# Altium PCB latest_Audio_Meter_V4.5.PcbDoc (part 2 of 4)
Units mil, origin at the board's own origin, x right, y up, seen from the top; angles counter-clockwise.
Board outline 2756.14 x 2519.69 mil, 2 copper layers (Top Layer, Bottom Layer), stack 57.087 mil thick; 115 components, 61 nets, 352 pads, 840 vias.
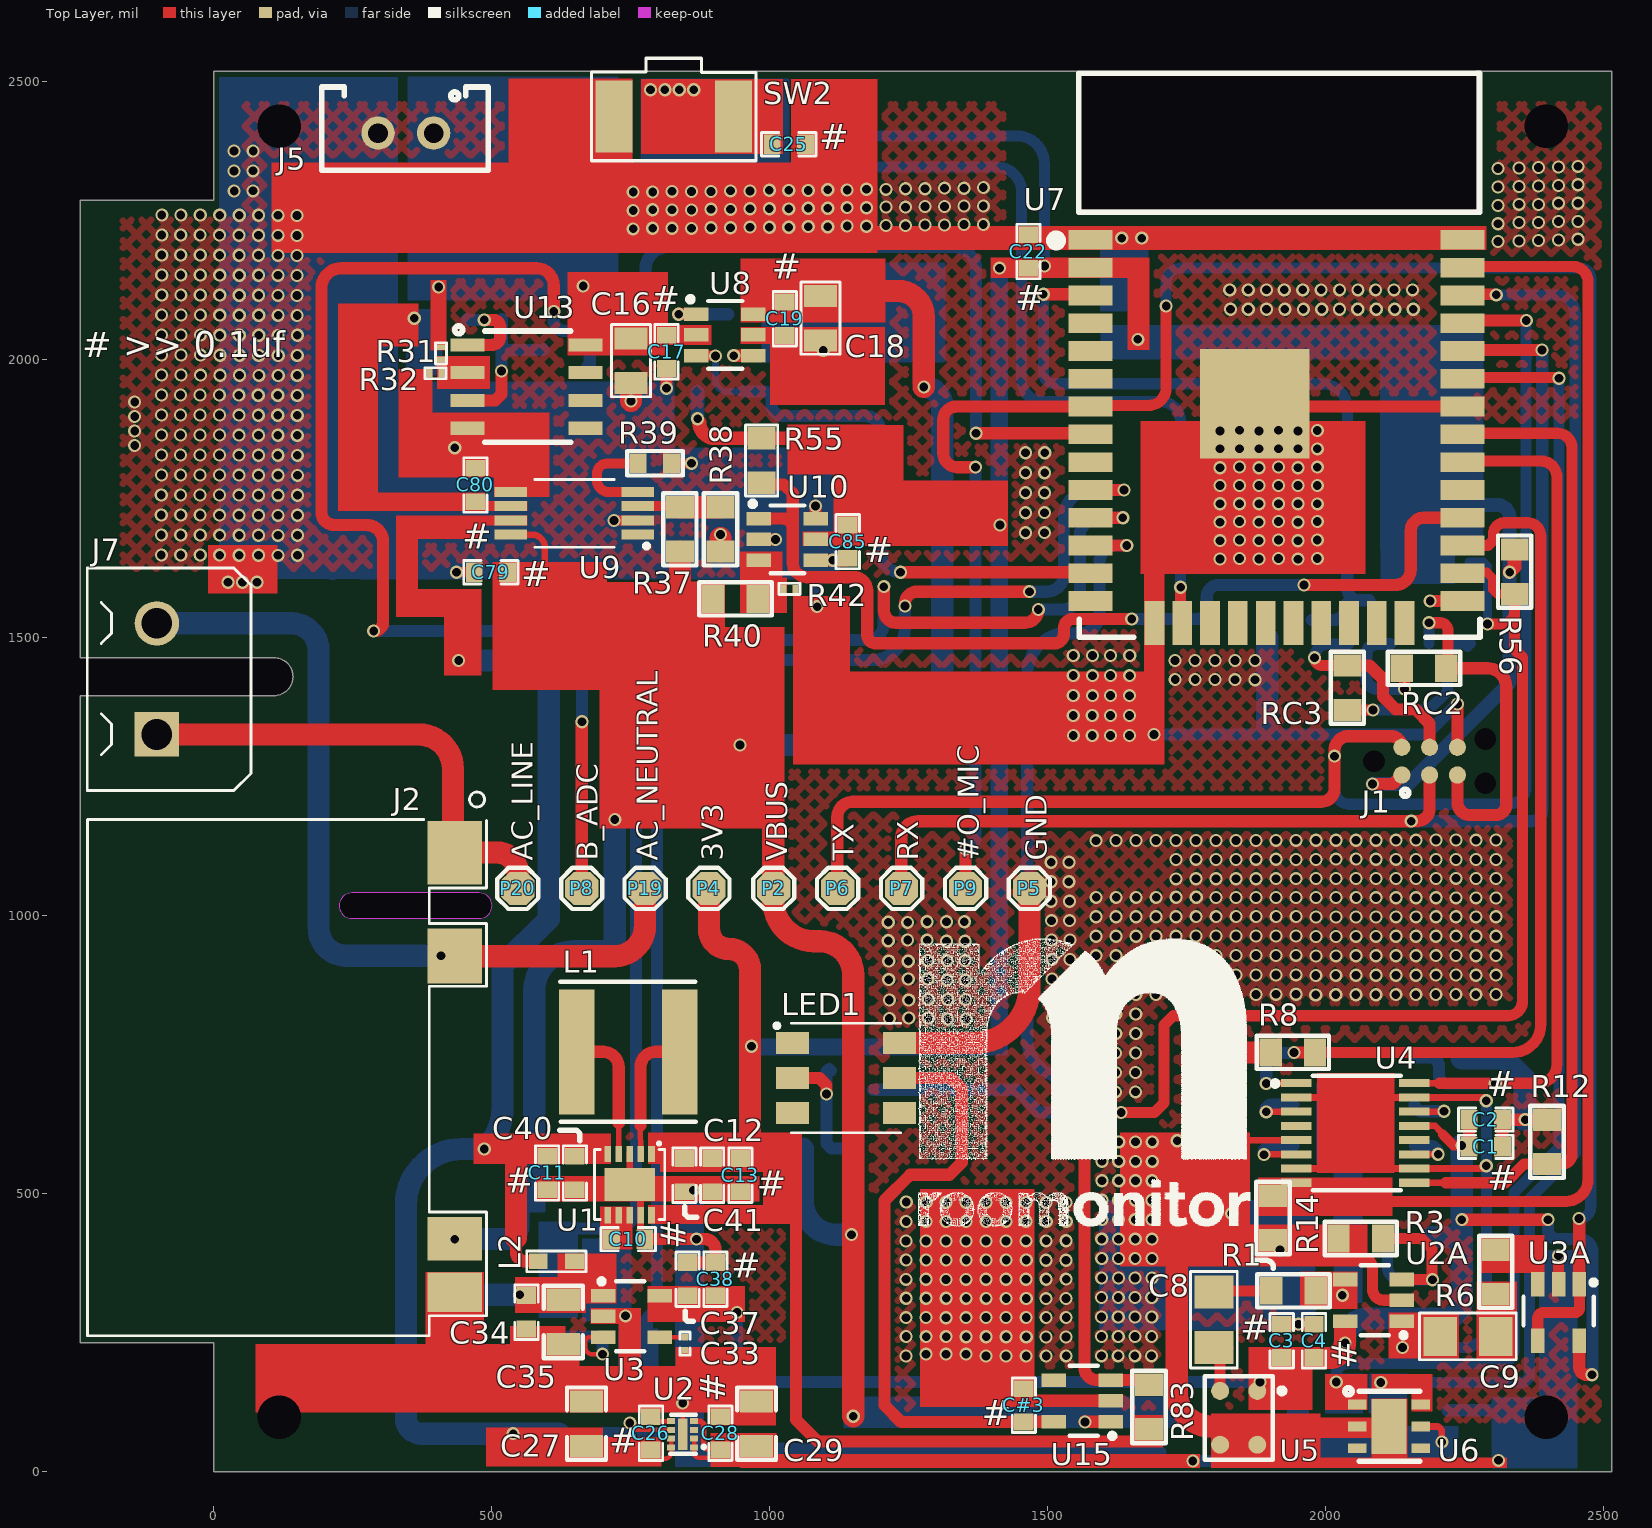
[diagram p0: Top Layer view]

## Part data (continued)
R1# R2 R3 R4 R4# R5 R8 R10 R12 R14 R24 R29 R35 R36 R37 R38 R40 R43 R56 R57 R83 RC1 RC2 RC3: library part ERJ-P06J103V, "RES SMD 10K OHM 5% 1/2W 0805", Case/Package=0805, Case Code (Metric)=2012, Manufacturer=Panasonic, Max Operating Temperature=155°C, Max Power Dissipation=500mW, Min Operating Temperature=-55°C, Package Quantity=1, Resistance=10kR, Supplier Part Number 1=P10KADCT-ND, Temperature Coefficient=200ppm/°C, Tolerance=5%, Voltage Rating=400V, Voltage Rating (DC)=150V, Case Code (Imperial)=0805, ComponentLink1Description=https://www.verical.com/server-webapp/html/getDatasheet?partID=409513, ComponentLink1URL=https://www.verical.com/server-webapp/html/getDatasheet?partID=409513, ComponentLink2Description=http://components.arrow.com/part/dataview/44988207S7163511N1174, ComponentLink2URL=http://components.arrow.com/part/dataview/44988207S7163511N1174, ComponentLink3Description=https://www.seielect.com/Catalog/SEI-RMCF_RMCP.pdf, ComponentLink3URL=https://www.seielect.com/Catalog/SEI-RMCF_RMCP.pdf, ComponentLink4Description=http://www.seielect.com/catalog/sei-rmc.pdf, ComponentLink4URL=http://www.seielect.com/catalog/sei-rmc.pdf, ComponentLink5Description=https://datasheet.ciiva.com/7777/424479-7777391.pdf, ComponentLink5URL=https://datasheet.ciiva.com/7777/424479-7777391.pdf, ComponentLink6Description=https://datasheet.ciiva.com/2581/crcwhpe3-2581488.pdf, ComponentLink6URL=https://datasheet.ciiva.com/2581/crcwhpe3-2581488.pdf, ComponentLink7Description=https://datasheet.ciiva.com/11808/0900766b80d98b26-11808546.pdf, ComponentLink7URL=https://datasheet.ciiva.com/11808/0900766b80d98b26-11808546.pdf, ComponentLink8Description=https://datasheet.ciiva.com/8934/dcrcwe3-8934585.pdf, ComponentLink8URL=https://datasheet.ciiva.com/8934/dcrcwe3-8934585.pdf, ComponentLink9Description=https://datasheet.ciiva.com/2467/dcrcwe3-2467241.pdf, ComponentLink9URL=https://datasheet.ciiva.com/2467/dcrcwe3-2467241.pdf, ComponentLink10Description=https://datasheet.ciiva.com/7777/1697337-7777401.pdf, ComponentLink10URL=https://datasheet.ciiva.com/7777/1697337-7777401.pdf, ComponentLink11Description=https://datasheet.ciiva.com/16852/dcrcwe3-16852347.pdf, ComponentLink11URL=https://datasheet.ciiva.com/16852/dcrcwe3-16852347.pdf, ComponentLink12Description=https://datasheet.ciiva.com/16200/dcrcwe3-16200123.pdf, ComponentLink12URL=https://datasheet.ciiva.com/16200/dcrcwe3-16200123.pdf, ComponentLink13Description=https://datasheet.ciiva.com/16725/70201119-16725227.pdf, ComponentLink13URL=https://datasheet.ciiva.com/16725/70201119-16725227.pdf, ComponentLink14Description=https://datasheet.ciiva.com/2467/dcrcwe3-2467239.pdf, ComponentLink14URL=https://datasheet.ciiva.com/2467/dcrcwe3-2467239.pdf, ComponentLink15Description=https://datasheet.ciiva.com/7777/1720486-7777575.pdf, ComponentLink15URL=https://datasheet.ciiva.com/7777/1720486-7777575.pdf, ComponentLink16Description=https://datasheet.ciiva.com/8934/dcrcwe3-8934581.pdf, ComponentLink16URL=https://datasheet.ciiva.com/8934/dcrcwe3-8934581.pdf, ComponentLink17Description=https://datasheet.ciiva.com/2467/dcrcwe3-2467240.pdf, ComponentLink17URL=https://datasheet.ciiva.com/2467/dcrcwe3-2467240.pdf, ComponentLink18Description=https://datasheet.ciiva.com/7777/1720486-7777576.pdf, ComponentLink18URL=https://datasheet.ciiva.com/7777/1720486-7777576.pdf, ComponentLink19Description=https://datasheet.ciiva.com/5546/dcrcwe3-109170-5546983.pdf, ComponentLink19URL=https://datasheet.ciiva.com/5546/dcrcwe3-109170-5546983.pdf, ComponentLink20Description=https://datasheet.ciiva.com/16755/70201119-16755757.pdf, ComponentLink20URL=https://datasheet.ciiva.com/16755/70201119-16755757.pdf, ComponentLink21Description=https://datasheet.ciiva.com/3258/dcrcwe3-3258221.pdf, ComponentLink21URL=https://datasheet.ciiva.com/3258/dcrcwe3-3258221.pdf, ComponentLink22Description=https://datasheet.ciiva.com/17204/dcrcwe3-17204398.pdf, ComponentLink22URL=https://datasheet.ciiva.com/17204/dcrcwe3-17204398.pdf, ComponentLink23Description=https://datasheet.ciiva.com/16435/dcrcwe3-16435934.pdf, ComponentLink23URL=https://datasheet.ciiva.com/16435/dcrcwe3-16435934.pdf, ComponentLink24Description=https://datasheet.ciiva.com/46441/1533075-46441628.pdf, ComponentLink24URL=https://datasheet.ciiva.com/46441/1533075-46441628.pdf, ComponentLink25Description=https://datasheet.ciiva.com/5544/dcrcwe3-109170-5544649.pdf, ComponentLink25URL=https://datasheet.ciiva.com/5544/dcrcwe3-109170-5544649.pdf, ComponentLink26Description=https://datasheet.ciiva.com/8337/dcrcwe3-8337669.pdf, ComponentLink26URL=https://datasheet.ciiva.com/8337/dcrcwe3-8337669.pdf, ComponentLink27Description=https://datasheet.ciiva.com/2463/dcrcwe3-2463179.pdf, ComponentLink27URL=https://datasheet.ciiva.com/2463/dcrcwe3-2463179.pdf, ComponentLink28Description=https://datasheet.ciiva.com/2463/dcrcwe3-2463178.pdf, ComponentLink28URL=https://datasheet.ciiva.com/2463/dcrcwe3-2463178.pdf, ComponentLink29Description=https://datasheet.ciiva.com/2474/crcwhpe3-2474640.pdf, ComponentLink29URL=https://datasheet.ciiva.com/2474/crcwhpe3-2474640.pdf, ComponentLink30Description=https://datasheet.ciiva.com/48527/crcwhpe3-48527638.pdf, ComponentLink30URL=https://datasheet.ciiva.com/48527/crcwhpe3-48527638.pdf, ComponentLink31Description=https://datasheet.ciiva.com/5547/crcwhpe3-46056-5547896.pdf, ComponentLink31URL=https://datasheet.ciiva.com/5547/crcwhpe3-46056-5547896.pdf, ComponentLink32Description=https://datasheet.ciiva.com/9112/crcwhpe3-9112140.pdf, ComponentLink32URL=https://datasheet.ciiva.com/9112/crcwhpe3-9112140.pdf, ComponentLink33Description=https://datasheet.ciiva.com/2474/crcwhpe3-2474638.pdf, ComponentLink33URL=https://datasheet.ciiva.com/2474/crcwhpe3-2474638.pdf, ComponentLink34Description=https://datasheet.ciiva.com/2474/crcwhpe3-2474639.pdf, ComponentLink34URL=https://datasheet.ciiva.com/2474/crcwhpe3-2474639.pdf, ComponentLink35Description=http://uk.rs-online.com/webdocs/12cb/0900766b812cb812.pdf?src-supplier=RSComponents, ComponentLink35URL=http://uk.rs-online.com/webdocs/12cb/0900766b812cb812.pdf?src-supplier=RSComponents, ComponentLink36Description=http://industrial.panasonic.com/www-data/pdf/AOA0000/AOA0000CE4.pdf?src-supplier=Avnet, ComponentLink36URL=http://industrial.panasonic.com/www-data/pdf/AOA0000/AOA0000CE4.pdf?src-supplier=Avnet, ComponentLink37Description=http://industrial.panasonic.com/www-data/pdf/AOA0000/AOA0000CE4.pdf?src-supplier=Future+Electronics, ComponentLink37URL=http://industrial.panasonic.com/www-data/pdf/AOA0000/AOA0000CE4.pdf?src-supplier=Future+Electronics, ComponentLink38Description=http://www.farnell.com/datasheets/2059624.pdf?src-supplier=Element14, ComponentLink38URL=http://www.farnell.com/datasheets/2059624.pdf?src-supplier=Element14, ComponentLink39Description=https://www.alliedelec.com/m/d/12e4be79354a6c30aae91f11e8182ea0.pdf?src-supplier=Allied+Electronics, ComponentLink39URL=https://www.alliedelec.com/m/d/12e4be79354a6c30aae91f11e8182ea0.pdf?src-supplier=Allied+Electronics, ComponentLink40Description=http://www.farnell.com/datasheets/2059624.pdf?src-supplier=Farnell, ComponentLink40URL=http://www.farnell.com/datasheets/2059624.pdf?src-supplier=Farnell, Composition="Thick Film", Contact Plating=Tin, Depth=1.25mm, Features="Automotive AEC-Q200", Height=0.6mm, Lead Free="Lead Free", Length=2mm, Manufacturer Part Number=ERJ-P06J103V, Military Standard=Not, Mount="Surface Mount", Number of Terminations=2, Packaging="Tape and Reel", Power Rating=500mW, Pricing 1="1=0.11, 10=0.103, 100=0.0396, 1000=0.0174, 2500=0.0151 (USD)", Radiation Hardening=No, REACH SVHC=Unknown, Stock 1=130484, Supplier 1=Digi-Key, Termination=SMD/SMT, Weight=0.000194oz, Width=0.049inch
R7: library part CRCW080547K0FKEAHP, "RES SMD 47K OHM 1% 1/3W 0805", Case/Package=0805, Case Code (Metric)=2012, Manufacturer=Vishay, Max Operating Temperature=155°C, Max Power Dissipation=333mW, Min Operating Temperature=-55°C, Package Quantity=10, Power Rating=330mW, Resistance=47kR, Temperature Coefficient=100ppm/°C, Tolerance=1%, Voltage Rating=150V, Case Code (Imperial)=0805, ComponentLink1Description=https://www.verical.com/server-webapp/html/getDatasheet?partID=409513, ComponentLink1URL=https://www.verical.com/server-webapp/html/getDatasheet?partID=409513, ComponentLink2Description=http://components.arrow.com/part/dataview/44988207S7163511N1174, ComponentLink2URL=http://components.arrow.com/part/dataview/44988207S7163511N1174, ComponentLink3Description=https://www.seielect.com/Catalog/SEI-RMCF_RMCP.pdf, ComponentLink3URL=https://www.seielect.com/Catalog/SEI-RMCF_RMCP.pdf, ComponentLink4Description=http://www.seielect.com/catalog/sei-rmc.pdf, ComponentLink4URL=http://www.seielect.com/catalog/sei-rmc.pdf, ComponentLink5Description=https://datasheet.ciiva.com/7777/424479-7777391.pdf, ComponentLink5URL=https://datasheet.ciiva.com/7777/424479-7777391.pdf, ComponentLink6Description=https://datasheet.ciiva.com/2581/crcwhpe3-2581488.pdf, ComponentLink6URL=https://datasheet.ciiva.com/2581/crcwhpe3-2581488.pdf, ComponentLink7Description=https://datasheet.ciiva.com/11808/0900766b80d98b26-11808546.pdf, ComponentLink7URL=https://datasheet.ciiva.com/11808/0900766b80d98b26-11808546.pdf, ComponentLink8Description=https://datasheet.ciiva.com/8934/dcrcwe3-8934585.pdf, ComponentLink8URL=https://datasheet.ciiva.com/8934/dcrcwe3-8934585.pdf, ComponentLink9Description=https://datasheet.ciiva.com/2467/dcrcwe3-2467241.pdf, ComponentLink9URL=https://datasheet.ciiva.com/2467/dcrcwe3-2467241.pdf, ComponentLink10Description=https://datasheet.ciiva.com/7777/1697337-7777401.pdf, ComponentLink10URL=https://datasheet.ciiva.com/7777/1697337-7777401.pdf, ComponentLink11Description=https://datasheet.ciiva.com/16852/dcrcwe3-16852347.pdf, ComponentLink11URL=https://datasheet.ciiva.com/16852/dcrcwe3-16852347.pdf, ComponentLink12Description=https://datasheet.ciiva.com/16200/dcrcwe3-16200123.pdf, ComponentLink12URL=https://datasheet.ciiva.com/16200/dcrcwe3-16200123.pdf, ComponentLink13Description=https://datasheet.ciiva.com/16725/70201119-16725227.pdf, ComponentLink13URL=https://datasheet.ciiva.com/16725/70201119-16725227.pdf, ComponentLink14Description=https://datasheet.ciiva.com/2467/dcrcwe3-2467239.pdf, ComponentLink14URL=https://datasheet.ciiva.com/2467/dcrcwe3-2467239.pdf, ComponentLink15Description=https://datasheet.ciiva.com/7777/1720486-7777575.pdf, ComponentLink15URL=https://datasheet.ciiva.com/7777/1720486-7777575.pdf, ComponentLink16Description=https://datasheet.ciiva.com/8934/dcrcwe3-8934581.pdf, ComponentLink16URL=https://datasheet.ciiva.com/8934/dcrcwe3-8934581.pdf, ComponentLink17Description=https://datasheet.ciiva.com/2467/dcrcwe3-2467240.pdf, ComponentLink17URL=https://datasheet.ciiva.com/2467/dcrcwe3-2467240.pdf, ComponentLink18Description=https://datasheet.ciiva.com/7777/1720486-7777576.pdf, ComponentLink18URL=https://datasheet.ciiva.com/7777/1720486-7777576.pdf, ComponentLink19Description=https://datasheet.ciiva.com/5546/dcrcwe3-109170-5546983.pdf, ComponentLink19URL=https://datasheet.ciiva.com/5546/dcrcwe3-109170-5546983.pdf, ComponentLink20Description=http://www.vishay.com/docs/20043/crcwhpe3.pdf?src-supplier=Digi-Key, ComponentLink20URL=http://www.vishay.com/docs/20043/crcwhpe3.pdf?src-supplier=Digi-Key, ComponentLink21Description=http://www.mouser.com/ds/2/427/crcwhpe3-46056.pdf?src-supplier=Mouser, ComponentLink21URL=http://www.mouser.com/ds/2/427/crcwhpe3-46056.pdf?src-supplier=Mouser, ComponentLink22Description=http://www.farnell.com/datasheets/2140397.pdf?src-supplier=Element14, ComponentLink22URL=http://www.farnell.com/datasheets/2140397.pdf?src-supplier=Element14, ComponentLink23Description=http://www.vishay.com/docs/20043/crcwhpe3.pdf?src-supplier=Avnet, ComponentLink23URL=http://www.vishay.com/docs/20043/crcwhpe3.pdf?src-supplier=Avnet, Composition="Thick Film", Contact Plating=Tin, Depth=1.25mm, Features="Automotive AEC-Q200", Height=0.024inch, Lead Free="Lead Free", Length=2mm, Manufacturer Part Number=CRCW080547K0FKEAHP, Mount="Surface Mount", Number of Terminations=2, Packaging="Cut Tape", Pricing 1="1=0.2375, 10=0.2014, 25=0.1942 (USD)", REACH SVHC=Unknown, Stock 1=55, Supplier 1=Arrow, Supplier Part Number 1=CRCW080547K0FKEAHP, Termination=SMD/SMT, Voltage Rating (DC)=150V, Weight=0.000194oz, Width=1.2mm
R9: library part ERJ-P06J104V, "RES SMD 100K OHM 5% 1/2W 0805", Case/Package=0805, Case Code (Metric)=2012, Manufacturer=Panasonic, Max Operating Temperature=155°C, Max Power Dissipation=250mW, Min Operating Temperature=-55°C, Package Quantity=5000, Power Rating=500mW, Resistance=100kR, Supplier Part Number 1=P100KADCT-ND, Temperature Coefficient=200ppm/°C, Tolerance=5%, Voltage Rating=400V, Voltage Rating (DC)=150V, Case Code (Imperial)=0805, ComponentLink1Description=https://www.verical.com/server-webapp/html/getDatasheet?partID=409513, ComponentLink1URL=https://www.verical.com/server-webapp/html/getDatasheet?partID=409513, ComponentLink2Description=http://components.arrow.com/part/dataview/44988207S7163511N1174, ComponentLink2URL=http://components.arrow.com/part/dataview/44988207S7163511N1174, ComponentLink3Description=https://www.seielect.com/Catalog/SEI-RMCF_RMCP.pdf, ComponentLink3URL=https://www.seielect.com/Catalog/SEI-RMCF_RMCP.pdf, ComponentLink4Description=http://www.seielect.com/catalog/sei-rmc.pdf, ComponentLink4URL=http://www.seielect.com/catalog/sei-rmc.pdf, ComponentLink5Description=https://datasheet.ciiva.com/7777/424479-7777391.pdf, ComponentLink5URL=https://datasheet.ciiva.com/7777/424479-7777391.pdf, ComponentLink6Description=https://datasheet.ciiva.com/2581/crcwhpe3-2581488.pdf, ComponentLink6URL=https://datasheet.ciiva.com/2581/crcwhpe3-2581488.pdf, ComponentLink7Description=https://datasheet.ciiva.com/11808/0900766b80d98b26-11808546.pdf, ComponentLink7URL=https://datasheet.ciiva.com/11808/0900766b80d98b26-11808546.pdf, ComponentLink8Description=https://datasheet.ciiva.com/8934/dcrcwe3-8934585.pdf, ComponentLink8URL=https://datasheet.ciiva.com/8934/dcrcwe3-8934585.pdf, ComponentLink9Description=https://datasheet.ciiva.com/2467/dcrcwe3-2467241.pdf, ComponentLink9URL=https://datasheet.ciiva.com/2467/dcrcwe3-2467241.pdf, ComponentLink10Description=https://datasheet.ciiva.com/7777/1697337-7777401.pdf, ComponentLink10URL=https://datasheet.ciiva.com/7777/1697337-7777401.pdf, ComponentLink11Description=https://datasheet.ciiva.com/16852/dcrcwe3-16852347.pdf, ComponentLink11URL=https://datasheet.ciiva.com/16852/dcrcwe3-16852347.pdf, ComponentLink12Description=https://datasheet.ciiva.com/16200/dcrcwe3-16200123.pdf, ComponentLink12URL=https://datasheet.ciiva.com/16200/dcrcwe3-16200123.pdf, ComponentLink13Description=https://datasheet.ciiva.com/16725/70201119-16725227.pdf, ComponentLink13URL=https://datasheet.ciiva.com/16725/70201119-16725227.pdf, ComponentLink14Description=https://datasheet.ciiva.com/2467/dcrcwe3-2467239.pdf, ComponentLink14URL=https://datasheet.ciiva.com/2467/dcrcwe3-2467239.pdf, ComponentLink15Description=https://datasheet.ciiva.com/7777/1720486-7777575.pdf, ComponentLink15URL=https://datasheet.ciiva.com/7777/1720486-7777575.pdf, ComponentLink16Description=https://datasheet.ciiva.com/8934/dcrcwe3-8934581.pdf, ComponentLink16URL=https://datasheet.ciiva.com/8934/dcrcwe3-8934581.pdf, ComponentLink17Description=https://datasheet.ciiva.com/2467/dcrcwe3-2467240.pdf, ComponentLink17URL=https://datasheet.ciiva.com/2467/dcrcwe3-2467240.pdf, ComponentLink18Description=https://datasheet.ciiva.com/7777/1720486-7777576.pdf, ComponentLink18URL=https://datasheet.ciiva.com/7777/1720486-7777576.pdf, ComponentLink19Description=https://datasheet.ciiva.com/5546/dcrcwe3-109170-5546983.pdf, ComponentLink19URL=https://datasheet.ciiva.com/5546/dcrcwe3-109170-5546983.pdf, ComponentLink20Description=https://datasheet.ciiva.com/16755/70201119-16755757.pdf, ComponentLink20URL=https://datasheet.ciiva.com/16755/70201119-16755757.pdf, ComponentLink21Description=https://datasheet.ciiva.com/3258/dcrcwe3-3258221.pdf, ComponentLink21URL=https://datasheet.ciiva.com/3258/dcrcwe3-3258221.pdf, ComponentLink22Description=https://datasheet.ciiva.com/17204/dcrcwe3-17204398.pdf, ComponentLink22URL=https://datasheet.ciiva.com/17204/dcrcwe3-17204398.pdf, ComponentLink23Description=https://datasheet.ciiva.com/16435/dcrcwe3-16435934.pdf, ComponentLink23URL=https://datasheet.ciiva.com/16435/dcrcwe3-16435934.pdf, ComponentLink24Description=https://datasheet.ciiva.com/46441/1533075-46441628.pdf, ComponentLink24URL=https://datasheet.ciiva.com/46441/1533075-46441628.pdf, ComponentLink25Description=https://datasheet.ciiva.com/5544/dcrcwe3-109170-5544649.pdf, ComponentLink25URL=https://datasheet.ciiva.com/5544/dcrcwe3-109170-5544649.pdf, ComponentLink26Description=https://datasheet.ciiva.com/8337/dcrcwe3-8337669.pdf, ComponentLink26URL=https://datasheet.ciiva.com/8337/dcrcwe3-8337669.pdf, ComponentLink27Description=https://datasheet.ciiva.com/2463/dcrcwe3-2463179.pdf, ComponentLink27URL=https://datasheet.ciiva.com/2463/dcrcwe3-2463179.pdf, ComponentLink28Description=https://datasheet.ciiva.com/2463/dcrcwe3-2463178.pdf, ComponentLink28URL=https://datasheet.ciiva.com/2463/dcrcwe3-2463178.pdf, ComponentLink29Description=https://datasheet.ciiva.com/2474/crcwhpe3-2474640.pdf, ComponentLink29URL=https://datasheet.ciiva.com/2474/crcwhpe3-2474640.pdf, ComponentLink30Description=https://datasheet.ciiva.com/48527/crcwhpe3-48527638.pdf, ComponentLink30URL=https://datasheet.ciiva.com/48527/crcwhpe3-48527638.pdf, ComponentLink31Description=https://datasheet.ciiva.com/5547/crcwhpe3-46056-5547896.pdf, ComponentLink31URL=https://datasheet.ciiva.com/5547/crcwhpe3-46056-5547896.pdf, ComponentLink32Description=https://datasheet.ciiva.com/9112/crcwhpe3-9112140.pdf, ComponentLink32URL=https://datasheet.ciiva.com/9112/crcwhpe3-9112140.pdf, ComponentLink33Description=https://datasheet.ciiva.com/2474/crcwhpe3-2474638.pdf, ComponentLink33URL=https://datasheet.ciiva.com/2474/crcwhpe3-2474638.pdf, ComponentLink34Description=https://datasheet.ciiva.com/2474/crcwhpe3-2474639.pdf, ComponentLink34URL=https://datasheet.ciiva.com/2474/crcwhpe3-2474639.pdf, ComponentLink35Description=http://uk.rs-online.com/webdocs/12cb/0900766b812cb812.pdf?src-supplier=RSComponents, ComponentLink35URL=http://uk.rs-online.com/webdocs/12cb/0900766b812cb812.pdf?src-supplier=RSComponents, ComponentLink36Description=http://industrial.panasonic.com/www-data/pdf/AOA0000/AOA0000CE4.pdf?src-supplier=Avnet, ComponentLink36URL=http://industrial.panasonic.com/www-data/pdf/AOA0000/AOA0000CE4.pdf?src-supplier=Avnet, ComponentLink37Description=http://industrial.panasonic.com/www-data/pdf/AOA0000/AOA0000CE4.pdf?src-supplier=Future+Electronics, ComponentLink37URL=http://industrial.panasonic.com/www-data/pdf/AOA0000/AOA0000CE4.pdf?src-supplier=Future+Electronics, ComponentLink38Description=http://www.farnell.com/datasheets/2059624.pdf?src-supplier=Element14, ComponentLink38URL=http://www.farnell.com/datasheets/2059624.pdf?src-supplier=Element14, ComponentLink39Description=https://www.alliedelec.com/m/d/12e4be79354a6c30aae91f11e8182ea0.pdf?src-supplier=Allied+Electronics, ComponentLink39URL=https://www.alliedelec.com/m/d/12e4be79354a6c30aae91f11e8182ea0.pdf?src-supplier=Allied+Electronics, ComponentLink40Description=http://www.farnell.com/datasheets/2059624.pdf?src-supplier=Farnell, ComponentLink40URL=http://www.farnell.com/datasheets/2059624.pdf?src-supplier=Farnell, ComponentLink41Description=http://industrial.panasonic.com/cdbs/www-data/pdf/RDO0000/AOA0000C331.pdf?src-supplier=Newark, ComponentLink41URL=http://industrial.panasonic.com/cdbs/www-data/pdf/RDO0000/AOA0000C331.pdf?src-supplier=Newark, ComponentLink42Description=https://industrial.panasonic.com/ww/system/files/data/download/catalog/id_fixed-resistors_e_1.pdf?src-supplier=Allied+Electronics, ComponentLink42URL=https://industrial.panasonic.com/ww/system/files/data/download/catalog/id_fixed-resistors_e_1.pdf?src-supplier=Allied+Electronics, ComponentLink43Description=http://industrial.panasonic.com/www-data/pdf/AOA0000/AOA0000CE4.pdf?src-supplier=Avnet+Europe, ComponentLink43URL=http://industrial.panasonic.com/www-data/pdf/AOA0000/AOA0000CE4.pdf?src-supplier=Avnet+Europe, Composition="Thick Film", Contact Plating=Tin, Depth=1.25mm, Height=0.6mm, Lead Free="Lead Free", Length=2mm, Manufacturer Part Number=ERJ-P06J104V, Military Standard=Not, Mount="Surface Mount", Number of Terminations=2, Packaging="Tape and Reel", Pricing 1="1=0.11, 10=0.103, 100=0.0396, 1000=0.0174, 2500=0.0151 (USD)", Radiation Hardening=No, REACH SVHC="No SVHC", Stock 1=131043, Supplier 1=Digi-Key, Termination=SMD/SMT, Width=1.2mm
R11: library part ERJ-P06J224V, "RES SMD 220K OHM 5% 1/2W 0805", Case/Package=0805, Case Code (Metric)=2012, Manufacturer=Panasonic, Max Operating Temperature=155°C, Max Power Dissipation=500mW, Min Operating Temperature=-55°C, Package Quantity=1, Resistance=220kR, Supplier Part Number 1=P220KADCT-ND, Temperature Coefficient=200ppm/°C, Tolerance=5%, Voltage Rating=150V, Case Code (Imperial)=0805, ComponentLink1Description=https://datasheet.ciiva.com/2474/crcwhpe3-2474640.pdf, ComponentLink1URL=https://datasheet.ciiva.com/2474/crcwhpe3-2474640.pdf, ComponentLink2Description=https://datasheet.ciiva.com/48527/crcwhpe3-48527638.pdf, ComponentLink2URL=https://datasheet.ciiva.com/48527/crcwhpe3-48527638.pdf, ComponentLink3Description=https://datasheet.ciiva.com/5547/crcwhpe3-46056-5547896.pdf, ComponentLink3URL=https://datasheet.ciiva.com/5547/crcwhpe3-46056-5547896.pdf, ComponentLink4Description=https://datasheet.ciiva.com/9112/crcwhpe3-9112140.pdf, ComponentLink4URL=https://datasheet.ciiva.com/9112/crcwhpe3-9112140.pdf, ComponentLink5Description=https://datasheet.ciiva.com/2474/crcwhpe3-2474638.pdf, ComponentLink5URL=https://datasheet.ciiva.com/2474/crcwhpe3-2474638.pdf, ComponentLink6Description=https://datasheet.ciiva.com/2474/crcwhpe3-2474639.pdf, ComponentLink6URL=https://datasheet.ciiva.com/2474/crcwhpe3-2474639.pdf, ComponentLink7Description=https://datasheet.ciiva.com/2474/crcwhpe3-2474641.pdf, ComponentLink7URL=https://datasheet.ciiva.com/2474/crcwhpe3-2474641.pdf, ComponentLink8Description=https://datasheet.ciiva.com/2474/crcwhpe3-2474642.pdf, ComponentLink8URL=https://datasheet.ciiva.com/2474/crcwhpe3-2474642.pdf, ComponentLink9Description=https://datasheet.ciiva.com/2474/crcwhpe3-2474643.pdf, ComponentLink9URL=https://datasheet.ciiva.com/2474/crcwhpe3-2474643.pdf, ComponentLink10Description=https://datasheet.ciiva.com/9051/crcwhpe3-9051301.pdf, ComponentLink10URL=https://datasheet.ciiva.com/9051/crcwhpe3-9051301.pdf, ComponentLink11Description=http://uk.rs-online.com/webdocs/12cb/0900766b812cb812.pdf?src-supplier=RSComponents, ComponentLink11URL=http://uk.rs-online.com/webdocs/12cb/0900766b812cb812.pdf?src-supplier=RSComponents, ComponentLink12Description=http://www.mouser.com/ds/2/315/AOA0000C291-1101061.pdf?src-supplier=Mouser, ComponentLink12URL=http://www.mouser.com/ds/2/315/AOA0000C291-1101061.pdf?src-supplier=Mouser, ComponentLink13Description=http://www.industrial.panasonic.com/www-data/pdf/AOA0000/AOA0000CE4.pdf?src-supplier=Element14, ComponentLink13URL=http://www.industrial.panasonic.com/www-data/pdf/AOA0000/AOA0000CE4.pdf?src-supplier=Element14, ComponentLink14Description=http://industrial.panasonic.com/www-data/pdf/AOA0000/AOA0000CE4.pdf?src-supplier=Avnet+Europe, ComponentLink14URL=http://industrial.panasonic.com/www-data/pdf/AOA0000/AOA0000CE4.pdf?src-supplier=Avnet+Europe, ComponentLink15Description=http://www.farnell.com/datasheets/2059624.pdf?src-supplier=Farnell, ComponentLink15URL=http://www.farnell.com/datasheets/2059624.pdf?src-supplier=Farnell, ComponentLink16Description=https://www.alliedelec.com/m/d/12e4be79354a6c30aae91f11e8182ea0.pdf?src-supplier=Allied+Electronics, ComponentLink16URL=https://www.alliedelec.com/m/d/12e4be79354a6c30aae91f11e8182ea0.pdf?src-supplier=Allied+Electronics, Composition="Thick Film", Contact Plating=Tin, Features="Automotive AEC-Q200", Height=0.028inch, Lead Free="Contains Lead", Length=0.079inch, Manufacturer Part Number=ERJ-P06J224V, Mount="Surface Mount", Number of Terminations=2, Packaging="Tape and Reel", Power Rating=500mW, Pricing 1="1=0.11, 10=0.103, 100=0.0396, 1000=0.0174, 2500=0.0151 (USD)", Radiation Hardening=No, Stock 1=14636, Supplier 1=Digi-Key, Voltage Rating (DC)=150V, Width=0.049inch
R13: library part CRCW0805470KFKEAHP, "RES SMD 470K OHM 1% 1/3W 0805", Case/Package=0805, Case Code (Metric)=2012, Manufacturer="Vishay Dale", Max Operating Temperature=155°C, Max Power Dissipation=500mW, Min Operating Temperature=-55°C, Package Quantity=5000, Power Rating=330mW, Resistance=470kR, Supplier Part Number 1=541-470KTCT-ND, Temperature Coefficient=100ppm/°C, Tolerance=1%, Case Code (Imperial)=0805, ComponentLink1Description=https://www.verical.com/server-webapp/html/getDatasheet?partID=409513, ComponentLink1URL=https://www.verical.com/server-webapp/html/getDatasheet?partID=409513, ComponentLink2Description=http://components.arrow.com/part/dataview/44988207S7163511N1174, ComponentLink2URL=http://components.arrow.com/part/dataview/44988207S7163511N1174, ComponentLink3Description=https://www.seielect.com/Catalog/SEI-RMCF_RMCP.pdf, ComponentLink3URL=https://www.seielect.com/Catalog/SEI-RMCF_RMCP.pdf, ComponentLink4Description=http://www.seielect.com/catalog/sei-rmc.pdf, ComponentLink4URL=http://www.seielect.com/catalog/sei-rmc.pdf, ComponentLink5Description=https://datasheet.ciiva.com/7777/424479-7777391.pdf, ComponentLink5URL=https://datasheet.ciiva.com/7777/424479-7777391.pdf, ComponentLink6Description=https://datasheet.ciiva.com/2581/crcwhpe3-2581488.pdf, ComponentLink6URL=https://datasheet.ciiva.com/2581/crcwhpe3-2581488.pdf, ComponentLink7Description=https://datasheet.ciiva.com/11808/0900766b80d98b26-11808546.pdf, ComponentLink7URL=https://datasheet.ciiva.com/11808/0900766b80d98b26-11808546.pdf, ComponentLink8Description=https://datasheet.ciiva.com/8934/dcrcwe3-8934585.pdf, ComponentLink8URL=https://datasheet.ciiva.com/8934/dcrcwe3-8934585.pdf, ComponentLink9Description=https://datasheet.ciiva.com/2467/dcrcwe3-2467241.pdf, ComponentLink9URL=https://datasheet.ciiva.com/2467/dcrcwe3-2467241.pdf, ComponentLink10Description=https://datasheet.ciiva.com/7777/1697337-7777401.pdf, ComponentLink10URL=https://datasheet.ciiva.com/7777/1697337-7777401.pdf, ComponentLink11Description=https://datasheet.ciiva.com/16852/dcrcwe3-16852347.pdf, ComponentLink11URL=https://datasheet.ciiva.com/16852/dcrcwe3-16852347.pdf, ComponentLink12Description=https://datasheet.ciiva.com/16200/dcrcwe3-16200123.pdf, ComponentLink12URL=https://datasheet.ciiva.com/16200/dcrcwe3-16200123.pdf, ComponentLink13Description=https://datasheet.ciiva.com/16725/70201119-16725227.pdf, ComponentLink13URL=https://datasheet.ciiva.com/16725/70201119-16725227.pdf, ComponentLink14Description=https://datasheet.ciiva.com/2467/dcrcwe3-2467239.pdf, ComponentLink14URL=https://datasheet.ciiva.com/2467/dcrcwe3-2467239.pdf, ComponentLink15Description=https://datasheet.ciiva.com/7777/1720486-7777575.pdf, ComponentLink15URL=https://datasheet.ciiva.com/7777/1720486-7777575.pdf, ComponentLink16Description=https://datasheet.ciiva.com/8934/dcrcwe3-8934581.pdf, ComponentLink16URL=https://datasheet.ciiva.com/8934/dcrcwe3-8934581.pdf, ComponentLink17Description=https://datasheet.ciiva.com/2467/dcrcwe3-2467240.pdf, ComponentLink17URL=https://datasheet.ciiva.com/2467/dcrcwe3-2467240.pdf, ComponentLink18Description=https://datasheet.ciiva.com/7777/1720486-7777576.pdf, ComponentLink18URL=https://datasheet.ciiva.com/7777/1720486-7777576.pdf, ComponentLink19Description=https://datasheet.ciiva.com/5546/dcrcwe3-109170-5546983.pdf, ComponentLink19URL=https://datasheet.ciiva.com/5546/dcrcwe3-109170-5546983.pdf, ComponentLink20Description=http://www.vishay.com/docs/20043/crcwhpe3.pdf?src-supplier=Digi-Key, ComponentLink20URL=http://www.vishay.com/docs/20043/crcwhpe3.pdf?src-supplier=Digi-Key, ComponentLink21Description=http://www.mouser.com/ds/2/427/crcwhpe3-46056.pdf?src-supplier=Mouser, ComponentLink21URL=http://www.mouser.com/ds/2/427/crcwhpe3-46056.pdf?src-supplier=Mouser, ComponentLink22Description=http://www.farnell.com/datasheets/2140397.pdf?src-supplier=Element14, ComponentLink22URL=http://www.farnell.com/datasheets/2140397.pdf?src-supplier=Element14, ComponentLink23Description=http://www.vishay.com/docs/20043/crcwhpe3.pdf?src-supplier=Avnet, ComponentLink23URL=http://www.vishay.com/docs/20043/crcwhpe3.pdf?src-supplier=Avnet, Composition="Thick Film", Contact Plating=Tin, Features="Automotive AEC-Q200", Height=0.024inch, Lead Free="Lead Free", Length=0.079inch, Manufacturer Part Number=CRCW0805470KFKEAHP, Mount="Surface Mount", Number of Terminations=2, Packaging="Tape and Reel", Pricing 1="1=0.25, 10=0.212, 100=0.0828, 1000=0.0347, 2500=0.0318 (USD)", Stock 1=5441, Supplier 1=Digi-Key, Termination=Wraparound, Width=0.049inch
R28: library part RC0402FR-07665RL, "RES SMD 665 OHM 1% 1/16W 0402", Case/Package=0402, Case Code (Metric)=1005, Manufacturer=Yageo, Max Operating Temperature=155°C, Max Power Dissipation=63mW, Min Operating Temperature=-55°C, Power Rating=62.5mW, Resistor Type="Thick Film", Supplier Part Number 1=YAG3208CT-ND, Temperature Coefficient=100ppm/°C, Tolerance=1%, Voltage Rating=50V, Case Code (Imperial)=0402, ComponentLink1Description=http://www.yageo.com/documents/recent/PYu-RC0402_51_RoHS_L_6.pdf?src-supplier=Avnet+Europe, ComponentLink1URL=http://www.yageo.com/documents/recent/PYu-RC0402_51_RoHS_L_6.pdf?src-supplier=Avnet+Europe, Contact Plating=Tin,Matte, Depth=0.5mm, Features="Moisture Resistant", Height=0.016inch, Lead Free="Lead Free", Length=1mm, Manufacturer Part Number=RC0402FR-07665RL, Military Standard=Not, Number of Terminations=2, Packaging="Tape and Reel", Pricing 1="1=0.1, 10=0.015, 100=0.0062, 1000=0.00278, 2500=0.00242, 5000=0.002 (USD)", Resistance=665R, Stock 1=287830, Supplier 1=Digi-Key, Termination=SMD/SMT, Width=0.02inch
R30: library part AC0402FR-0730K9L, "RES SMD 30.9K OHM 1% 1/16W 0402", Case/Package=0402, Case Code (Metric)=1005, Manufacturer=Yageo, Max Operating Temperature=155°C, Max Power Dissipation=63mW, Min Operating Temperature=-55°C, Power Rating=62.5mW, Resistance=30.9kR, Supplier Part Number 1=AC0402FR-0730K9L-ND, Temperature Coefficient=100ppm/°C, Tolerance=1%, Voltage Rating=50V, Case Code (Imperial)=0402, ComponentLink1Description=http://www.mouser.com/ds/2/447/yageodocoutput-1111992.pdf?src-supplier=Mouser, ComponentLink1URL=http://www.mouser.com/ds/2/447/yageodocoutput-1111992.pdf?src-supplier=Mouser, ComponentLink2Description=http://www.yageo.com/NewPortal/yageodocoutput?fileName=/pdf/R-Chip/PYu-AC_51_RoHS_L_6.pdf&src-supplier=Digi-Key, ComponentLink2URL=http://www.yageo.com/NewPortal/yageodocoutput?fileName=/pdf/R-Chip/PYu-AC_51_RoHS_L_6.pdf&src-supplier=Digi-Key, Composition="Thick Film", Features="Moisture Resistant,Automotive AEC-Q200", Height=0.015inch, Length=0.039inch, Manufacturer Part Number=AC0402FR-0730K9L, Number of Terminations=2, Packaging="Tape and Reel", Pricing 1="10000=0.0022 (USD)", Stock 1=0, Supplier 1=Digi-Key, Termination=SMD/SMT, Weight=2.3E-05oz, Width=0.5mm
R31: library part AC0201FR-0728KL, "RES SMD 28K OHM 1% 1/20W 0201", Case/Package=0201, Manufacturer=Yageo, Max Operating Temperature=155°C, Max Power Dissipation=50mW, Min Operating Temperature=-55°C, Resistance=28kR, Resistor Type="Thick Film", Supplier Part Number 1=YAG5186CT-ND, Temperature Coefficient=200ppm/°C, Tolerance=1%, Category="Chip SMD Resistors", ComponentLink1Description=http://www.yageo.com/NewPortal/yageodocoutput?fileName=/pdf/R-Chip/PYu-AC_51_RoHS_L_5.pdf&src-supplier=Digi-Key, ComponentLink1URL=http://www.yageo.com/NewPortal/yageodocoutput?fileName=/pdf/R-Chip/PYu-AC_51_RoHS_L_5.pdf&src-supplier=Digi-Key, Features="Moisture Resistant,Automotive AEC-Q200", Height=0.01inch, Length=0.024inch, Manufacturer Part Number=AC0201FR-0728KL, Number of Terminations=2, Packaging="Tape and Reel", Pricing 1="1=0.10000, 10=0.06300, 100=0.02560, 1000=0.01149, 2500=0.00997, 5000=0.00823 (USD)", RoHS=Yes, RoHS Compliant=Yes, Stock 1=5954, Supplier 1=Digi-Key, Width=0.012inch
R32 R42: library part AC0201FR-0720KL, "RES SMD 20K OHM 1% 1/20W 0201", Case/Package=0201, Case Code (Metric)=0603, Manufacturer=Yageo, Max Operating Temperature=155°C, Max Power Dissipation=50mW, Min Operating Temperature=-55°C, Resistance=20kR, Resistor Type="Thick Film", Supplier Part Number 1=YAG3419CT-ND, Temperature Coefficient=200ppm/°C, Tolerance=1%, Case Code (Imperial)=0201, Category="Chip SMD Resistors", ComponentLink1Description=http://www.yageo.com/NewPortal/yageodocoutput?fileName=/pdf/R-Chip/PYu-AC_51_RoHS_L_6.pdf&src-supplier=Digi-Key, ComponentLink1URL=http://www.yageo.com/NewPortal/yageodocoutput?fileName=/pdf/R-Chip/PYu-AC_51_RoHS_L_6.pdf&src-supplier=Digi-Key, Features="Moisture Resistant,Automotive AEC-Q200", Height=0.01inch, Length=0.024inch, Manufacturer Part Number=AC0201FR-0720KL, Number of Terminations=2, Packaging="Tape and Reel", Pricing 1="1=0.10000, 10=0.06300, 100=0.02560, 1000=0.01149, 2500=0.00997, 5000=0.00823 (USD)", RoHS=Yes, RoHS Compliant=Yes, Stock 1=11473, Supplier 1=Digi-Key, Width=0.012inch
R33 R34: library part ERJ-P06J105V, "RES SMD 1M OHM 5% 1/2W 0805", Case/Package=0805, Case Code (Metric)=2012, Manufacturer=Panasonic, Max Operating Temperature=155°C, Max Power Dissipation=500mW, Min Operating Temperature=-55°C, Package Quantity=1, Resistance=1MR, Supplier Part Number 1=P1.0MADCT-ND, Temperature Coefficient=200ppm/°C, Tolerance=5%, Voltage Rating=400V, Voltage Rating (DC)=150V, Case Code (Imperial)=0805, ComponentLink1Description=https://www.verical.com/server-webapp/html/getDatasheet?partID=409513, ComponentLink1URL=https://www.verical.com/server-webapp/html/getDatasheet?partID=409513, ComponentLink2Description=http://components.arrow.com/part/dataview/44988207S7163511N1174, ComponentLink2URL=http://components.arrow.com/part/dataview/44988207S7163511N1174, ComponentLink3Description=https://www.seielect.com/Catalog/SEI-RMCF_RMCP.pdf, ComponentLink3URL=https://www.seielect.com/Catalog/SEI-RMCF_RMCP.pdf, ComponentLink4Description=http://www.seielect.com/catalog/sei-rmc.pdf, ComponentLink4URL=http://www.seielect.com/catalog/sei-rmc.pdf, ComponentLink5Description=https://datasheet.ciiva.com/7777/424479-7777391.pdf, ComponentLink5URL=https://datasheet.ciiva.com/7777/424479-7777391.pdf, ComponentLink6Description=https://datasheet.ciiva.com/2581/crcwhpe3-2581488.pdf, ComponentLink6URL=https://datasheet.ciiva.com/2581/crcwhpe3-2581488.pdf, ComponentLink7Description=https://datasheet.ciiva.com/11808/0900766b80d98b26-11808546.pdf, ComponentLink7URL=https://datasheet.ciiva.com/11808/0900766b80d98b26-11808546.pdf, ComponentLink8Description=https://datasheet.ciiva.com/8934/dcrcwe3-8934585.pdf, ComponentLink8URL=https://datasheet.ciiva.com/8934/dcrcwe3-8934585.pdf, ComponentLink9Description=https://datasheet.ciiva.com/2467/dcrcwe3-2467241.pdf, ComponentLink9URL=https://datasheet.ciiva.com/2467/dcrcwe3-2467241.pdf, ComponentLink10Description=https://datasheet.ciiva.com/7777/1697337-7777401.pdf, ComponentLink10URL=https://datasheet.ciiva.com/7777/1697337-7777401.pdf, ComponentLink11Description=https://datasheet.ciiva.com/16852/dcrcwe3-16852347.pdf, ComponentLink11URL=https://datasheet.ciiva.com/16852/dcrcwe3-16852347.pdf, ComponentLink12Description=https://datasheet.ciiva.com/16200/dcrcwe3-16200123.pdf, ComponentLink12URL=https://datasheet.ciiva.com/16200/dcrcwe3-16200123.pdf, ComponentLink13Description=https://datasheet.ciiva.com/16725/70201119-16725227.pdf, ComponentLink13URL=https://datasheet.ciiva.com/16725/70201119-16725227.pdf, ComponentLink14Description=https://datasheet.ciiva.com/2467/dcrcwe3-2467239.pdf, ComponentLink14URL=https://datasheet.ciiva.com/2467/dcrcwe3-2467239.pdf, ComponentLink15Description=https://datasheet.ciiva.com/7777/1720486-7777575.pdf, ComponentLink15URL=https://datasheet.ciiva.com/7777/1720486-7777575.pdf, ComponentLink16Description=https://datasheet.ciiva.com/8934/dcrcwe3-8934581.pdf, ComponentLink16URL=https://datasheet.ciiva.com/8934/dcrcwe3-8934581.pdf, ComponentLink17Description=https://datasheet.ciiva.com/2467/dcrcwe3-2467240.pdf, ComponentLink17URL=https://datasheet.ciiva.com/2467/dcrcwe3-2467240.pdf, ComponentLink18Description=https://datasheet.ciiva.com/7777/1720486-7777576.pdf, ComponentLink18URL=https://datasheet.ciiva.com/7777/1720486-7777576.pdf, ComponentLink19Description=https://datasheet.ciiva.com/5546/dcrcwe3-109170-5546983.pdf, ComponentLink19URL=https://datasheet.ciiva.com/5546/dcrcwe3-109170-5546983.pdf, ComponentLink20Description=https://datasheet.ciiva.com/16755/70201119-16755757.pdf, ComponentLink20URL=https://datasheet.ciiva.com/16755/70201119-16755757.pdf, ComponentLink21Description=https://datasheet.ciiva.com/3258/dcrcwe3-3258221.pdf, ComponentLink21URL=https://datasheet.ciiva.com/3258/dcrcwe3-3258221.pdf, ComponentLink22Description=https://datasheet.ciiva.com/17204/dcrcwe3-17204398.pdf, ComponentLink22URL=https://datasheet.ciiva.com/17204/dcrcwe3-17204398.pdf, ComponentLink23Description=https://datasheet.ciiva.com/16435/dcrcwe3-16435934.pdf, ComponentLink23URL=https://datasheet.ciiva.com/16435/dcrcwe3-16435934.pdf, ComponentLink24Description=https://datasheet.ciiva.com/46441/1533075-46441628.pdf, ComponentLink24URL=https://datasheet.ciiva.com/46441/1533075-46441628.pdf, ComponentLink25Description=https://datasheet.ciiva.com/5544/dcrcwe3-109170-5544649.pdf, ComponentLink25URL=https://datasheet.ciiva.com/5544/dcrcwe3-109170-5544649.pdf, ComponentLink26Description=https://datasheet.ciiva.com/8337/dcrcwe3-8337669.pdf, ComponentLink26URL=https://datasheet.ciiva.com/8337/dcrcwe3-8337669.pdf, ComponentLink27Description=https://datasheet.ciiva.com/2463/dcrcwe3-2463179.pdf, ComponentLink27URL=https://datasheet.ciiva.com/2463/dcrcwe3-2463179.pdf, ComponentLink28Description=https://datasheet.ciiva.com/2463/dcrcwe3-2463178.pdf, ComponentLink28URL=https://datasheet.ciiva.com/2463/dcrcwe3-2463178.pdf, ComponentLink29Description=https://datasheet.ciiva.com/2474/crcwhpe3-2474640.pdf, ComponentLink29URL=https://datasheet.ciiva.com/2474/crcwhpe3-2474640.pdf, ComponentLink30Description=https://datasheet.ciiva.com/48527/crcwhpe3-48527638.pdf, ComponentLink30URL=https://datasheet.ciiva.com/48527/crcwhpe3-48527638.pdf, ComponentLink31Description=https://datasheet.ciiva.com/5547/crcwhpe3-46056-5547896.pdf, ComponentLink31URL=https://datasheet.ciiva.com/5547/crcwhpe3-46056-5547896.pdf, ComponentLink32Description=https://datasheet.ciiva.com/9112/crcwhpe3-9112140.pdf, ComponentLink32URL=https://datasheet.ciiva.com/9112/crcwhpe3-9112140.pdf, ComponentLink33Description=https://datasheet.ciiva.com/2474/crcwhpe3-2474638.pdf, ComponentLink33URL=https://datasheet.ciiva.com/2474/crcwhpe3-2474638.pdf, ComponentLink34Description=https://datasheet.ciiva.com/2474/crcwhpe3-2474639.pdf, ComponentLink34URL=https://datasheet.ciiva.com/2474/crcwhpe3-2474639.pdf, ComponentLink35Description=http://uk.rs-online.com/webdocs/12cb/0900766b812cb812.pdf?src-supplier=RSComponents, ComponentLink35URL=http://uk.rs-online.com/webdocs/12cb/0900766b812cb812.pdf?src-supplier=RSComponents, ComponentLink36Description=http://industrial.panasonic.com/www-data/pdf/AOA0000/AOA0000CE4.pdf?src-supplier=Avnet, ComponentLink36URL=http://industrial.panasonic.com/www-data/pdf/AOA0000/AOA0000CE4.pdf?src-supplier=Avnet, ComponentLink37Description=http://industrial.panasonic.com/www-data/pdf/AOA0000/AOA0000CE4.pdf?src-supplier=Future+Electronics, ComponentLink37URL=http://industrial.panasonic.com/www-data/pdf/AOA0000/AOA0000CE4.pdf?src-supplier=Future+Electronics, ComponentLink38Description=http://www.farnell.com/datasheets/2059624.pdf?src-supplier=Element14, ComponentLink38URL=http://www.farnell.com/datasheets/2059624.pdf?src-supplier=Element14, ComponentLink39Description=https://www.alliedelec.com/m/d/12e4be79354a6c30aae91f11e8182ea0.pdf?src-supplier=Allied+Electronics, ComponentLink39URL=https://www.alliedelec.com/m/d/12e4be79354a6c30aae91f11e8182ea0.pdf?src-supplier=Allied+Electronics, ComponentLink40Description=http://www.farnell.com/datasheets/2059624.pdf?src-supplier=Farnell, ComponentLink40URL=http://www.farnell.com/datasheets/2059624.pdf?src-supplier=Farnell, ComponentLink41Description=http://www.alliedelec.com/m/d/12e4be79354a6c30aae91f11e8182ea0.pdf?src-supplier=Allied+Electronics, ComponentLink41URL=http://www.alliedelec.com/m/d/12e4be79354a6c30aae91f11e8182ea0.pdf?src-supplier=Allied+Electronics, ComponentLink42Description=http://www.mouser.com/ds/2/315/AOA0000CE4-64075.pdf?src-supplier=Mouser, ComponentLink42URL=http://www.mouser.com/ds/2/315/AOA0000CE4-64075.pdf?src-supplier=Mouser, ComponentLink43Description=http://industrial.panasonic.com/www-data/pdf/AOA0000/AOA0000CE4.pdf?src-supplier=Avnet+Europe, ComponentLink43URL=http://industrial.panasonic.com/www-data/pdf/AOA0000/AOA0000CE4.pdf?src-supplier=Avnet+Europe, Composition="Thick Film", Contact Plating=Tin, Depth=1.25mm, Features="Automotive AEC-Q200", Height=0.6mm, Lead Free="Lead Free", Length=2mm, Manufacturer Part Number=ERJ-P06J105V, Military Standard=Not, Mount="Surface Mount", Number of Terminations=2, Packaging="Tape and Reel", Power Rating=500mW, Pricing 1="1=0.11, 10=0.103, 100=0.0396, 1000=0.0174, 2500=0.0151 (USD)", Radiation Hardening=No, REACH SVHC=Unknown, Stock 1=57880, Supplier 1=Digi-Key, Termination=SMD/SMT, Width=0.049inch
R39: library part PAT0603E4000BST1, "RES SMD 400 OHM 0.1% 0.15W 0603", Case/Package=0603, Case Code (Metric)=1608, Manufacturer="Vishay Dale Thin Film", Max Operating Temperature=155°C, Max Power Dissipation=150mW, Min Operating Temperature=-55°C, Package Quantity=1, Resistor Type="Thin Film", Supplier Part Number 1=PAT400ACT-ND, Temperature Coefficient=25ppm/°C, Tolerance=0.1%, Voltage Rating=75V, Case Code (Imperial)=0603, Category="Chip SMD Resistors", ComponentLink1Description=https://datasheet.ciiva.com/2529/pat-2529079.pdf?src-supplier=Digi-Key, ComponentLink1URL=https://datasheet.ciiva.com/2529/pat-2529079.pdf?src-supplier=Digi-Key, ComponentLink2Description=https://datasheet.ciiva.com/2529/pat-2529080.pdf?src-supplier=Digi-Key, ComponentLink2URL=https://datasheet.ciiva.com/2529/pat-2529080.pdf?src-supplier=Digi-Key, ComponentLink3Description=https://datasheet.ciiva.com/2529/pat-2529081.pdf?src-supplier=Digi-Key, ComponentLink3URL=https://datasheet.ciiva.com/2529/pat-2529081.pdf?src-supplier=Digi-Key, Depth=0.81mm, Features="Moisture Resistant,Automotive AEC-Q200,Anti-Sulfur", Height=0.018inch, Length=0.064inch, Manufacturer Part Number=PAT0603E4000BST1, Military Standard=Not, Number of Terminations=2, Packaging="Tape and Reel", Power Rating=150mW, Pricing 1="1=0.84000, 10=0.72600, 100=0.50600 (USD)", Resistance=400R, RoHS=Yes, Stock 1=48558, Supplier 1=Digi-Key, Termination=SMD/SMT, Width=0.762mm